# Altium PCB adau1979-fpga.PcbDoc (part 4 of 10)
Units mil, origin at the board's own origin, x right, y up, seen from the top; angles counter-clockwise.
Board outline 7874.02 x 9055.12 mil, 4 copper layers (Top Layer, GND, POWER, Bottom Layer), stack 23.756 mil thick; 636 components, 457 nets, 2015 pads, 4184 vias.
Unrouted connection lines stored in the file: 10.
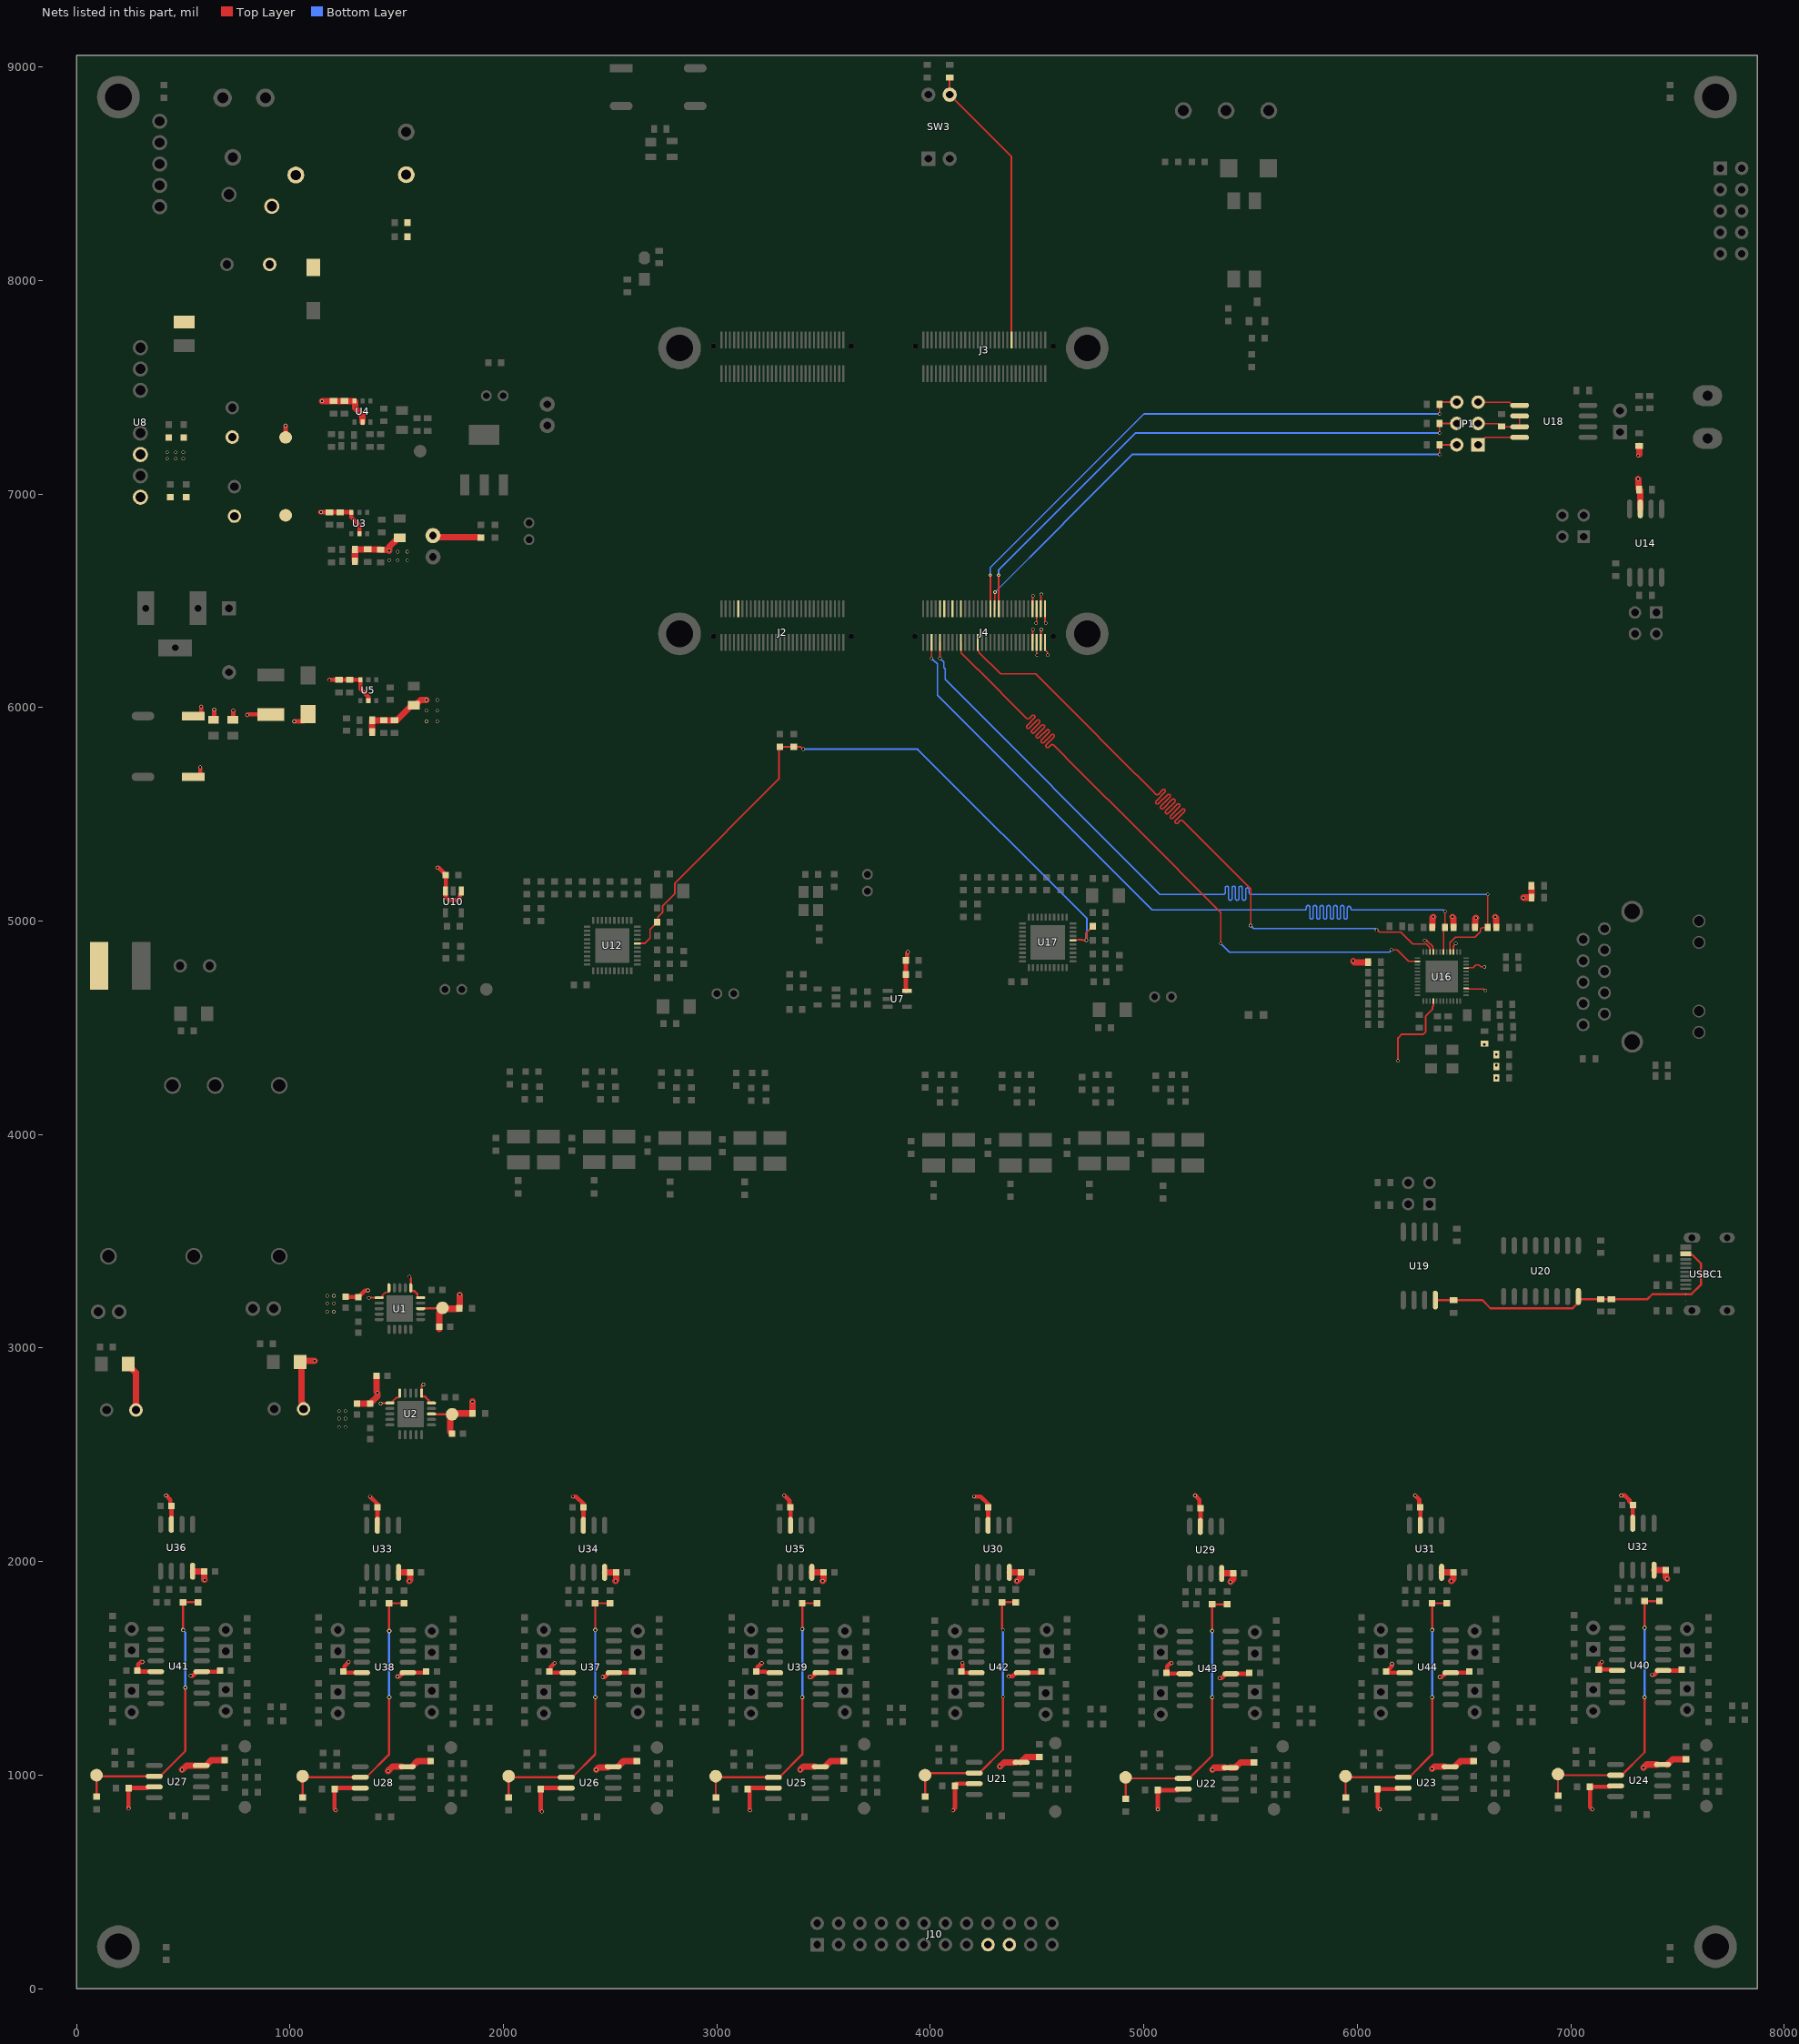
[diagram p4: the nets of this part, all layers, seen from the top]

## Part data (continued)
R1 R2 R3 R4 R5 R6 R7 R8 R9 R10 R11 R12 R13 R14 R15 R16 R17 R18 R19 R20 R21 R22 R23 R24 R27 R28 R29 R31 R32 R33 R34 R35 R (continued)
  R190: AddInBom=yes, DesignItemID=R, Device=R, FootprintName="R 0603_L", LibraryName="0.1 - 电阻-电容-电感", Origin Footprint="R 0201_L", OriginFootprint 2="R 0402_L", OriginFootprint 3="R 0805_L", OriginFootprint 4="R 1206_L", OriginFootprint 5="R 1210_L", OriginFootprint 6="R 1812_L", OriginFootprint 7="R 2010_L", OriginFootprint 8="R 2512_L", OriginFootprint 9="R 0201_M", OriginFootprint 10="R 0402_M", OriginFootprint 11="R 0603_M", OriginFootprint 12="R 0805_M", OriginFootprint 13="R 1206_M", OriginFootprint 14="R 1210_M", OriginFootprint 15="R 1812_M", OriginFootprint 16="R 2010_M", OriginFootprint 17="R 2512_M", OriginModelName="R 0603", SymbolName=R, UniqueId=bc27cb7a11a997be, 封装库来自淘宝卖家 ID：黄晶宝石=其他店铺购入均为盗版，不享受售后技术支持服务，请立即申请退款, 版权归属="来自淘宝 ID：黄晶宝石", 联系售后=https://shop463601444.taobao.com
  R191: AddInBom=yes, DesignItemID=R, Device=R, FootprintName="R 0603_L", LibraryName="0.1 - 电阻-电容-电感", Origin Footprint="R 0201_L", OriginFootprint 2="R 0402_L", OriginFootprint 3="R 0805_L", OriginFootprint 4="R 1206_L", OriginFootprint 5="R 1210_L", OriginFootprint 6="R 1812_L", OriginFootprint 7="R 2010_L", OriginFootprint 8="R 2512_L", OriginFootprint 9="R 0201_M", OriginFootprint 10="R 0402_M", OriginFootprint 11="R 0603_M", OriginFootprint 12="R 0805_M", OriginFootprint 13="R 1206_M", OriginFootprint 14="R 1210_M", OriginFootprint 15="R 1812_M", OriginFootprint 16="R 2010_M", OriginFootprint 17="R 2512_M", OriginModelName="R 0603", SymbolName=R, UniqueId=a6f8c12e5677218f, 封装库来自淘宝卖家 ID：黄晶宝石=其他店铺购入均为盗版，不享受售后技术支持服务，请立即申请退款, 版权归属="来自淘宝 ID：黄晶宝石", 联系售后=https://shop463601444.taobao.com
  R192: AddInBom=yes, DesignItemID=R, Device=R, FootprintName="R 0603_L", LibraryName="0.1 - 电阻-电容-电感", Origin Footprint="R 0201_L", OriginFootprint 2="R 0402_L", OriginFootprint 3="R 0805_L", OriginFootprint 4="R 1206_L", OriginFootprint 5="R 1210_L", OriginFootprint 6="R 1812_L", OriginFootprint 7="R 2010_L", OriginFootprint 8="R 2512_L", OriginFootprint 9="R 0201_M", OriginFootprint 10="R 0402_M", OriginFootprint 11="R 0603_M", OriginFootprint 12="R 0805_M", OriginFootprint 13="R 1206_M", OriginFootprint 14="R 1210_M", OriginFootprint 15="R 1812_M", OriginFootprint 16="R 2010_M", OriginFootprint 17="R 2512_M", OriginModelName="R 0603", SymbolName=R, UniqueId=da75effbc0c418b2, 封装库来自淘宝卖家 ID：黄晶宝石=其他店铺购入均为盗版，不享受售后技术支持服务，请立即申请退款, 版权归属="来自淘宝 ID：黄晶宝石", 联系售后=https://shop463601444.taobao.com
  R194: AddInBom=yes, DesignItemID=R, Device=R, FootprintName="R 0603_L", LibraryName="0.1 - 电阻-电容-电感", Origin Footprint="R 0201_L", OriginFootprint 2="R 0402_L", OriginFootprint 3="R 0805_L", OriginFootprint 4="R 1206_L", OriginFootprint 5="R 1210_L", OriginFootprint 6="R 1812_L", OriginFootprint 7="R 2010_L", OriginFootprint 8="R 2512_L", OriginFootprint 9="R 0201_M", OriginFootprint 10="R 0402_M", OriginFootprint 11="R 0603_M", OriginFootprint 12="R 0805_M", OriginFootprint 13="R 1206_M", OriginFootprint 14="R 1210_M", OriginFootprint 15="R 1812_M", OriginFootprint 16="R 2010_M", OriginFootprint 17="R 2512_M", OriginModelName="R 0603", SymbolName=R, UniqueId=41260ea8bae6dc8d, 封装库来自淘宝卖家 ID：黄晶宝石=其他店铺购入均为盗版，不享受售后技术支持服务，请立即申请退款, 版权归属="来自淘宝 ID：黄晶宝石", 联系售后=https://shop463601444.taobao.com
  R195: AddInBom=yes, DesignItemID=R, Device=R, FootprintName="R 0603_L", LibraryName="0.1 - 电阻-电容-电感", Origin Footprint="R 0201_L", OriginFootprint 2="R 0402_L", OriginFootprint 3="R 0805_L", OriginFootprint 4="R 1206_L", OriginFootprint 5="R 1210_L", OriginFootprint 6="R 1812_L", OriginFootprint 7="R 2010_L", OriginFootprint 8="R 2512_L", OriginFootprint 9="R 0201_M", OriginFootprint 10="R 0402_M", OriginFootprint 11="R 0603_M", OriginFootprint 12="R 0805_M", OriginFootprint 13="R 1206_M", OriginFootprint 14="R 1210_M", OriginFootprint 15="R 1812_M", OriginFootprint 16="R 2010_M", OriginFootprint 17="R 2512_M", OriginModelName="R 0603", SymbolName=R, UniqueId=df29ef2d077fcbbf, 封装库来自淘宝卖家 ID：黄晶宝石=其他店铺购入均为盗版，不享受售后技术支持服务，请立即申请退款, 版权归属="来自淘宝 ID：黄晶宝石", 联系售后=https://shop463601444.taobao.com
  R196: AddInBom=yes, DesignItemID=R, Device=R, FootprintName="R 0603_L", LibraryName="0.1 - 电阻-电容-电感", Origin Footprint="R 0201_L", OriginFootprint 2="R 0402_L", OriginFootprint 3="R 0805_L", OriginFootprint 4="R 1206_L", OriginFootprint 5="R 1210_L", OriginFootprint 6="R 1812_L", OriginFootprint 7="R 2010_L", OriginFootprint 8="R 2512_L", OriginFootprint 9="R 0201_M", OriginFootprint 10="R 0402_M", OriginFootprint 11="R 0603_M", OriginFootprint 12="R 0805_M", OriginFootprint 13="R 1206_M", OriginFootprint 14="R 1210_M", OriginFootprint 15="R 1812_M", OriginFootprint 16="R 2010_M", OriginFootprint 17="R 2512_M", OriginModelName="R 0603", SymbolName=R, UniqueId=e988a913e3416cdd, 封装库来自淘宝卖家 ID：黄晶宝石=其他店铺购入均为盗版，不享受售后技术支持服务，请立即申请退款, 版权归属="来自淘宝 ID：黄晶宝石", 联系售后=https://shop463601444.taobao.com
  R197: AddInBom=yes, DesignItemID=R, Device=R, FootprintName="R 0603_L", LibraryName="0.1 - 电阻-电容-电感", Origin Footprint="R 0201_L", OriginFootprint 2="R 0402_L", OriginFootprint 3="R 0805_L", OriginFootprint 4="R 1206_L", OriginFootprint 5="R 1210_L", OriginFootprint 6="R 1812_L", OriginFootprint 7="R 2010_L", OriginFootprint 8="R 2512_L", OriginFootprint 9="R 0201_M", OriginFootprint 10="R 0402_M", OriginFootprint 11="R 0603_M", OriginFootprint 12="R 0805_M", OriginFootprint 13="R 1206_M", OriginFootprint 14="R 1210_M", OriginFootprint 15="R 1812_M", OriginFootprint 16="R 2010_M", OriginFootprint 17="R 2512_M", OriginModelName="R 0603", SymbolName=R, UniqueId=a1dc1d7ffb4193e6, 封装库来自淘宝卖家 ID：黄晶宝石=其他店铺购入均为盗版，不享受售后技术支持服务，请立即申请退款, 版权归属="来自淘宝 ID：黄晶宝石", 联系售后=https://shop463601444.taobao.com
  R198: AddInBom=yes, DesignItemID=R, Device=R, FootprintName="R 0603_L", LibraryName="0.1 - 电阻-电容-电感", Origin Footprint="R 0201_L", OriginFootprint 2="R 0402_L", OriginFootprint 3="R 0805_L", OriginFootprint 4="R 1206_L", OriginFootprint 5="R 1210_L", OriginFootprint 6="R 1812_L", OriginFootprint 7="R 2010_L", OriginFootprint 8="R 2512_L", OriginFootprint 9="R 0201_M", OriginFootprint 10="R 0402_M", OriginFootprint 11="R 0603_M", OriginFootprint 12="R 0805_M", OriginFootprint 13="R 1206_M", OriginFootprint 14="R 1210_M", OriginFootprint 15="R 1812_M", OriginFootprint 16="R 2010_M", OriginFootprint 17="R 2512_M", OriginModelName="R 0603", SymbolName=R, UniqueId=94189e0415d5623f, 封装库来自淘宝卖家 ID：黄晶宝石=其他店铺购入均为盗版，不享受售后技术支持服务，请立即申请退款, 版权归属="来自淘宝 ID：黄晶宝石", 联系售后=https://shop463601444.taobao.com
  R199: AddInBom=yes, DesignItemID=R, Device=R, FootprintName="R 0603_L", LibraryName="0.1 - 电阻-电容-电感", Origin Footprint="R 0201_L", OriginFootprint 2="R 0402_L", OriginFootprint 3="R 0805_L", OriginFootprint 4="R 1206_L", OriginFootprint 5="R 1210_L", OriginFootprint 6="R 1812_L", OriginFootprint 7="R 2010_L", OriginFootprint 8="R 2512_L", OriginFootprint 9="R 0201_M", OriginFootprint 10="R 0402_M", OriginFootprint 11="R 0603_M", OriginFootprint 12="R 0805_M", OriginFootprint 13="R 1206_M", OriginFootprint 14="R 1210_M", OriginFootprint 15="R 1812_M", OriginFootprint 16="R 2010_M", OriginFootprint 17="R 2512_M", OriginModelName="R 0603", SymbolName=R, UniqueId=acf15e2cdf1c818f, 封装库来自淘宝卖家 ID：黄晶宝石=其他店铺购入均为盗版，不享受售后技术支持服务，请立即申请退款, 版权归属="来自淘宝 ID：黄晶宝石", 联系售后=https://shop463601444.taobao.com
  R200: AddInBom=yes, DesignItemID=R, Device=R, FootprintName="R 0603_L", LibraryName="0.1 - 电阻-电容-电感", Origin Footprint="R 0201_L", OriginFootprint 2="R 0402_L", OriginFootprint 3="R 0805_L", OriginFootprint 4="R 1206_L", OriginFootprint 5="R 1210_L", OriginFootprint 6="R 1812_L", OriginFootprint 7="R 2010_L", OriginFootprint 8="R 2512_L", OriginFootprint 9="R 0201_M", OriginFootprint 10="R 0402_M", OriginFootprint 11="R 0603_M", OriginFootprint 12="R 0805_M", OriginFootprint 13="R 1206_M", OriginFootprint 14="R 1210_M", OriginFootprint 15="R 1812_M", OriginFootprint 16="R 2010_M", OriginFootprint 17="R 2512_M", OriginModelName="R 0603", SymbolName=R, UniqueId=3520350cb8a16ddf, 封装库来自淘宝卖家 ID：黄晶宝石=其他店铺购入均为盗版，不享受售后技术支持服务，请立即申请退款, 版权归属="来自淘宝 ID：黄晶宝石", 联系售后=https://shop463601444.taobao.com
  R201: AddInBom=yes, DesignItemID=R, Device=R, FootprintName="R 0603_L", LibraryName="0.1 - 电阻-电容-电感", Origin Footprint="R 0201_L", OriginFootprint 2="R 0402_L", OriginFootprint 3="R 0805_L", OriginFootprint 4="R 1206_L", OriginFootprint 5="R 1210_L", OriginFootprint 6="R 1812_L", OriginFootprint 7="R 2010_L", OriginFootprint 8="R 2512_L", OriginFootprint 9="R 0201_M", OriginFootprint 10="R 0402_M", OriginFootprint 11="R 0603_M", OriginFootprint 12="R 0805_M", OriginFootprint 13="R 1206_M", OriginFootprint 14="R 1210_M", OriginFootprint 15="R 1812_M", OriginFootprint 16="R 2010_M", OriginFootprint 17="R 2512_M", OriginModelName="R 0603", SymbolName=R, UniqueId=ff64ea784eb901ab, 封装库来自淘宝卖家 ID：黄晶宝石=其他店铺购入均为盗版，不享受售后技术支持服务，请立即申请退款, 版权归属="来自淘宝 ID：黄晶宝石", 联系售后=https://shop463601444.taobao.com
  R202: AddInBom=yes, DesignItemID=R, Device=R, FootprintName="R 0603_L", LibraryName="0.1 - 电阻-电容-电感", Origin Footprint="R 0201_L", OriginFootprint 2="R 0402_L", OriginFootprint 3="R 0805_L", OriginFootprint 4="R 1206_L", OriginFootprint 5="R 1210_L", OriginFootprint 6="R 1812_L", OriginFootprint 7="R 2010_L", OriginFootprint 8="R 2512_L", OriginFootprint 9="R 0201_M", OriginFootprint 10="R 0402_M", OriginFootprint 11="R 0603_M", OriginFootprint 12="R 0805_M", OriginFootprint 13="R 1206_M", OriginFootprint 14="R 1210_M", OriginFootprint 15="R 1812_M", OriginFootprint 16="R 2010_M", OriginFootprint 17="R 2512_M", OriginModelName="R 0603", SymbolName=R, UniqueId=1887dacec97403d3, 封装库来自淘宝卖家 ID：黄晶宝石=其他店铺购入均为盗版，不享受售后技术支持服务，请立即申请退款, 版权归属="来自淘宝 ID：黄晶宝石", 联系售后=https://shop463601444.taobao.com
  R203: AddInBom=yes, DesignItemID=R, Device=R, FootprintName="R 0603_L", LibraryName="0.1 - 电阻-电容-电感", Origin Footprint="R 0201_L", OriginFootprint 2="R 0402_L", OriginFootprint 3="R 0805_L", OriginFootprint 4="R 1206_L", OriginFootprint 5="R 1210_L", OriginFootprint 6="R 1812_L", OriginFootprint 7="R 2010_L", OriginFootprint 8="R 2512_L", OriginFootprint 9="R 0201_M", OriginFootprint 10="R 0402_M", OriginFootprint 11="R 0603_M", OriginFootprint 12="R 0805_M", OriginFootprint 13="R 1206_M", OriginFootprint 14="R 1210_M", OriginFootprint 15="R 1812_M", OriginFootprint 16="R 2010_M", OriginFootprint 17="R 2512_M", OriginModelName="R 0603", SymbolName=R, UniqueId=90aa3c19b060f889, 封装库来自淘宝卖家 ID：黄晶宝石=其他店铺购入均为盗版，不享受售后技术支持服务，请立即申请退款, 版权归属="来自淘宝 ID：黄晶宝石", 联系售后=https://shop463601444.taobao.com
  R206: AddInBom=yes, DesignItemID=R, Device=R, FootprintName="R 0603_L", LibraryName="0.1 - 电阻-电容-电感", Origin Footprint="R 0201_L", OriginFootprint 2="R 0402_L", OriginFootprint 3="R 0805_L", OriginFootprint 4="R 1206_L", OriginFootprint 5="R 1210_L", OriginFootprint 6="R 1812_L", OriginFootprint 7="R 2010_L", OriginFootprint 8="R 2512_L", OriginFootprint 9="R 0201_M", OriginFootprint 10="R 0402_M", OriginFootprint 11="R 0603_M", OriginFootprint 12="R 0805_M", OriginFootprint 13="R 1206_M", OriginFootprint 14="R 1210_M", OriginFootprint 15="R 1812_M", OriginFootprint 16="R 2010_M", OriginFootprint 17="R 2512_M", OriginModelName="R 0603", SymbolName=R, UniqueId=50053c9146ba4240, 封装库来自淘宝卖家 ID：黄晶宝石=其他店铺购入均为盗版，不享受售后技术支持服务，请立即申请退款, 版权归属="来自淘宝 ID：黄晶宝石", 联系售后=https://shop463601444.taobao.com
  R207: AddInBom=yes, DesignItemID=R, Device=R, FootprintName="R 0603_L", LibraryName="0.1 - 电阻-电容-电感", Origin Footprint="R 0201_L", OriginFootprint 2="R 0402_L", OriginFootprint 3="R 0805_L", OriginFootprint 4="R 1206_L", OriginFootprint 5="R 1210_L", OriginFootprint 6="R 1812_L", OriginFootprint 7="R 2010_L", OriginFootprint 8="R 2512_L", OriginFootprint 9="R 0201_M", OriginFootprint 10="R 0402_M", OriginFootprint 11="R 0603_M", OriginFootprint 12="R 0805_M", OriginFootprint 13="R 1206_M", OriginFootprint 14="R 1210_M", OriginFootprint 15="R 1812_M", OriginFootprint 16="R 2010_M", OriginFootprint 17="R 2512_M", OriginModelName="R 0603", SymbolName=R, UniqueId=55d3b7675eee0b5f, 封装库来自淘宝卖家 ID：黄晶宝石=其他店铺购入均为盗版，不享受售后技术支持服务，请立即申请退款, 版权归属="来自淘宝 ID：黄晶宝石", 联系售后=https://shop463601444.taobao.com
  R209: AddInBom=yes, DesignItemID=R, Device=R, FootprintName="R 0603_L", LibraryName="0.1 - 电阻-电容-电感", Origin Footprint="R 0201_L", OriginFootprint 2="R 0402_L", OriginFootprint 3="R 0805_L", OriginFootprint 4="R 1206_L", OriginFootprint 5="R 1210_L", OriginFootprint 6="R 1812_L", OriginFootprint 7="R 2010_L", OriginFootprint 8="R 2512_L", OriginFootprint 9="R 0201_M", OriginFootprint 10="R 0402_M", OriginFootprint 11="R 0603_M", OriginFootprint 12="R 0805_M", OriginFootprint 13="R 1206_M", OriginFootprint 14="R 1210_M", OriginFootprint 15="R 1812_M", OriginFootprint 16="R 2010_M", OriginFootprint 17="R 2512_M", OriginModelName="R 0603", SymbolName=R, UniqueId=28145adf450505d9, 封装库来自淘宝卖家 ID：黄晶宝石=其他店铺购入均为盗版，不享受售后技术支持服务，请立即申请退款, 版权归属="来自淘宝 ID：黄晶宝石", 联系售后=https://shop463601444.taobao.com
  R210: AddInBom=yes, DesignItemID=R, Device=R, FootprintName="R 0603_L", LibraryName="0.1 - 电阻-电容-电感", Origin Footprint="R 0201_L", OriginFootprint 2="R 0402_L", OriginFootprint 3="R 0805_L", OriginFootprint 4="R 1206_L", OriginFootprint 5="R 1210_L", OriginFootprint 6="R 1812_L", OriginFootprint 7="R 2010_L", OriginFootprint 8="R 2512_L", OriginFootprint 9="R 0201_M", OriginFootprint 10="R 0402_M", OriginFootprint 11="R 0603_M", OriginFootprint 12="R 0805_M", OriginFootprint 13="R 1206_M", OriginFootprint 14="R 1210_M", OriginFootprint 15="R 1812_M", OriginFootprint 16="R 2010_M", OriginFootprint 17="R 2512_M", OriginModelName="R 0603", SymbolName=R, UniqueId=6a81be30a454b297, 封装库来自淘宝卖家 ID：黄晶宝石=其他店铺购入均为盗版，不享受售后技术支持服务，请立即申请退款, 版权归属="来自淘宝 ID：黄晶宝石", 联系售后=https://shop463601444.taobao.com
  R214: AddInBom=yes, DesignItemID=R, Device=R, FootprintName="R 0603_L", LibraryName="0.1 - 电阻-电容-电感", Origin Footprint="R 0201_L", OriginFootprint 2="R 0402_L", OriginFootprint 3="R 0805_L", OriginFootprint 4="R 1206_L", OriginFootprint 5="R 1210_L", OriginFootprint 6="R 1812_L", OriginFootprint 7="R 2010_L", OriginFootprint 8="R 2512_L", OriginFootprint 9="R 0201_M", OriginFootprint 10="R 0402_M", OriginFootprint 11="R 0603_M", OriginFootprint 12="R 0805_M", OriginFootprint 13="R 1206_M", OriginFootprint 14="R 1210_M", OriginFootprint 15="R 1812_M", OriginFootprint 16="R 2010_M", OriginFootprint 17="R 2512_M", OriginModelName="R 0603", SymbolName=R, UniqueId=356270ea20700a9c, 封装库来自淘宝卖家 ID：黄晶宝石=其他店铺购入均为盗版，不享受售后技术支持服务，请立即申请退款, 版权归属="来自淘宝 ID：黄晶宝石", 联系售后=https://shop463601444.taobao.com
  R215: AddInBom=yes, DesignItemID=R, Device=R, FootprintName="R 0603_L", LibraryName="0.1 - 电阻-电容-电感", Origin Footprint="R 0201_L", OriginFootprint 2="R 0402_L", OriginFootprint 3="R 0805_L", OriginFootprint 4="R 1206_L", OriginFootprint 5="R 1210_L", OriginFootprint 6="R 1812_L", OriginFootprint 7="R 2010_L", OriginFootprint 8="R 2512_L", OriginFootprint 9="R 0201_M", OriginFootprint 10="R 0402_M", OriginFootprint 11="R 0603_M", OriginFootprint 12="R 0805_M", OriginFootprint 13="R 1206_M", OriginFootprint 14="R 1210_M", OriginFootprint 15="R 1812_M", OriginFootprint 16="R 2010_M", OriginFootprint 17="R 2512_M", OriginModelName="R 0603", SymbolName=R, UniqueId=0bc07fc535f36e79, 封装库来自淘宝卖家 ID：黄晶宝石=其他店铺购入均为盗版，不享受售后技术支持服务，请立即申请退款, 版权归属="来自淘宝 ID：黄晶宝石", 联系售后=https://shop463601444.taobao.com
  R216: AddInBom=yes, DesignItemID=R, Device=R, FootprintName="R 0603_L", LibraryName="0.1 - 电阻-电容-电感", Origin Footprint="R 0201_L", OriginFootprint 2="R 0402_L", OriginFootprint 3="R 0805_L", OriginFootprint 4="R 1206_L", OriginFootprint 5="R 1210_L", OriginFootprint 6="R 1812_L", OriginFootprint 7="R 2010_L", OriginFootprint 8="R 2512_L", OriginFootprint 9="R 0201_M", OriginFootprint 10="R 0402_M", OriginFootprint 11="R 0603_M", OriginFootprint 12="R 0805_M", OriginFootprint 13="R 1206_M", OriginFootprint 14="R 1210_M", OriginFootprint 15="R 1812_M", OriginFootprint 16="R 2010_M", OriginFootprint 17="R 2512_M", OriginModelName="R 0603", SymbolName=R, UniqueId=4df6a426e202bc68, 封装库来自淘宝卖家 ID：黄晶宝石=其他店铺购入均为盗版，不享受售后技术支持服务，请立即申请退款, 版权归属="来自淘宝 ID：黄晶宝石", 联系售后=https://shop463601444.taobao.com
  R217: AddInBom=yes, DesignItemID=R, Device=R, FootprintName="R 0603_L", LibraryName="0.1 - 电阻-电容-电感", Origin Footprint="R 0201_L", OriginFootprint 2="R 0402_L", OriginFootprint 3="R 0805_L", OriginFootprint 4="R 1206_L", OriginFootprint 5="R 1210_L", OriginFootprint 6="R 1812_L", OriginFootprint 7="R 2010_L", OriginFootprint 8="R 2512_L", OriginFootprint 9="R 0201_M", OriginFootprint 10="R 0402_M", OriginFootprint 11="R 0603_M", OriginFootprint 12="R 0805_M", OriginFootprint 13="R 1206_M", OriginFootprint 14="R 1210_M", OriginFootprint 15="R 1812_M", OriginFootprint 16="R 2010_M", OriginFootprint 17="R 2512_M", OriginModelName="R 0603", SymbolName=R, UniqueId=b62d5738e8aadfe3, 封装库来自淘宝卖家 ID：黄晶宝石=其他店铺购入均为盗版，不享受售后技术支持服务，请立即申请退款, 版权归属="来自淘宝 ID：黄晶宝石", 联系售后=https://shop463601444.taobao.com
  R219: AddInBom=yes, DesignItemID=R, Device=R, FootprintName="R 0603_L", LibraryName="0.1 - 电阻-电容-电感", Origin Footprint="R 0201_L", OriginFootprint 2="R 0402_L", OriginFootprint 3="R 0805_L", OriginFootprint 4="R 1206_L", OriginFootprint 5="R 1210_L", OriginFootprint 6="R 1812_L", OriginFootprint 7="R 2010_L", OriginFootprint 8="R 2512_L", OriginFootprint 9="R 0201_M", OriginFootprint 10="R 0402_M", OriginFootprint 11="R 0603_M", OriginFootprint 12="R 0805_M", OriginFootprint 13="R 1206_M", OriginFootprint 14="R 1210_M", OriginFootprint 15="R 1812_M", OriginFootprint 16="R 2010_M", OriginFootprint 17="R 2512_M", OriginModelName="R 0603", SymbolName=R, UniqueId=f6a722bea999a1f8, 封装库来自淘宝卖家 ID：黄晶宝石=其他店铺购入均为盗版，不享受售后技术支持服务，请立即申请退款, 版权归属="来自淘宝 ID：黄晶宝石", 联系售后=https://shop463601444.taobao.com
  R220: AddInBom=yes, DesignItemID=R, Device=R, FootprintName="R 0603_L", LibraryName="0.1 - 电阻-电容-电感", Origin Footprint="R 0201_L", OriginFootprint 2="R 0402_L", OriginFootprint 3="R 0805_L", OriginFootprint 4="R 1206_L", OriginFootprint 5="R 1210_L", OriginFootprint 6="R 1812_L", OriginFootprint 7="R 2010_L", OriginFootprint 8="R 2512_L", OriginFootprint 9="R 0201_M", OriginFootprint 10="R 0402_M", OriginFootprint 11="R 0603_M", OriginFootprint 12="R 0805_M", OriginFootprint 13="R 1206_M", OriginFootprint 14="R 1210_M", OriginFootprint 15="R 1812_M", OriginFootprint 16="R 2010_M", OriginFootprint 17="R 2512_M", OriginModelName="R 0603", SymbolName=R, UniqueId=85b67f9d76b2e874, 封装库来自淘宝卖家 ID：黄晶宝石=其他店铺购入均为盗版，不享受售后技术支持服务，请立即申请退款, 版权归属="来自淘宝 ID：黄晶宝石", 联系售后=https://shop463601444.taobao.com
  R222: AddInBom=yes, DesignItemID=R, Device=R, FootprintName="R 0603_L", LibraryName="0.1 - 电阻-电容-电感", Origin Footprint="R 0201_L", OriginFootprint 2="R 0402_L", OriginFootprint 3="R 0805_L", OriginFootprint 4="R 1206_L", OriginFootprint 5="R 1210_L", OriginFootprint 6="R 1812_L", OriginFootprint 7="R 2010_L", OriginFootprint 8="R 2512_L", OriginFootprint 9="R 0201_M", OriginFootprint 10="R 0402_M", OriginFootprint 11="R 0603_M", OriginFootprint 12="R 0805_M", OriginFootprint 13="R 1206_M", OriginFootprint 14="R 1210_M", OriginFootprint 15="R 1812_M", OriginFootprint 16="R 2010_M", OriginFootprint 17="R 2512_M", OriginModelName="R 0603", SymbolName=R, UniqueId=e0ee0f05e2f0b4da, 封装库来自淘宝卖家 ID：黄晶宝石=其他店铺购入均为盗版，不享受售后技术支持服务，请立即申请退款, 版权归属="来自淘宝 ID：黄晶宝石", 联系售后=https://shop463601444.taobao.com
  R223: AddInBom=yes, DesignItemID=R, Device=R, FootprintName="R 0603_L", LibraryName="0.1 - 电阻-电容-电感", Origin Footprint="R 0201_L", OriginFootprint 2="R 0402_L", OriginFootprint 3="R 0805_L", OriginFootprint 4="R 1206_L", OriginFootprint 5="R 1210_L", OriginFootprint 6="R 1812_L", OriginFootprint 7="R 2010_L", OriginFootprint 8="R 2512_L", OriginFootprint 9="R 0201_M", OriginFootprint 10="R 0402_M", OriginFootprint 11="R 0603_M", OriginFootprint 12="R 0805_M", OriginFootprint 13="R 1206_M", OriginFootprint 14="R 1210_M", OriginFootprint 15="R 1812_M", OriginFootprint 16="R 2010_M", OriginFootprint 17="R 2512_M", OriginModelName="R 0603", SymbolName=R, UniqueId=3fbbebc0b09736fe, 封装库来自淘宝卖家 ID：黄晶宝石=其他店铺购入均为盗版，不享受售后技术支持服务，请立即申请退款, 版权归属="来自淘宝 ID：黄晶宝石", 联系售后=https://shop463601444.taobao.com
  R224: AddInBom=yes, DesignItemID=R, Device=R, FootprintName="R 0603_L", LibraryName="0.1 - 电阻-电容-电感", Origin Footprint="R 0201_L", OriginFootprint 2="R 0402_L", OriginFootprint 3="R 0805_L", OriginFootprint 4="R 1206_L", OriginFootprint 5="R 1210_L", OriginFootprint 6="R 1812_L", OriginFootprint 7="R 2010_L", OriginFootprint 8="R 2512_L", OriginFootprint 9="R 0201_M", OriginFootprint 10="R 0402_M", OriginFootprint 11="R 0603_M", OriginFootprint 12="R 0805_M", OriginFootprint 13="R 1206_M", OriginFootprint 14="R 1210_M", OriginFootprint 15="R 1812_M", OriginFootprint 16="R 2010_M", OriginFootprint 17="R 2512_M", OriginModelName="R 0603", SymbolName=R, UniqueId=1ad54b734ffff27e, 封装库来自淘宝卖家 ID：黄晶宝石=其他店铺购入均为盗版，不享受售后技术支持服务，请立即申请退款, 版权归属="来自淘宝 ID：黄晶宝石", 联系售后=https://shop463601444.taobao.com
  R225: AddInBom=yes, DesignItemID=R, Device=R, FootprintName="R 0603_L", LibraryName="0.1 - 电阻-电容-电感", Origin Footprint="R 0201_L", OriginFootprint 2="R 0402_L", OriginFootprint 3="R 0805_L", OriginFootprint 4="R 1206_L", OriginFootprint 5="R 1210_L", OriginFootprint 6="R 1812_L", OriginFootprint 7="R 2010_L", OriginFootprint 8="R 2512_L", OriginFootprint 9="R 0201_M", OriginFootprint 10="R 0402_M", OriginFootprint 11="R 0603_M", OriginFootprint 12="R 0805_M", OriginFootprint 13="R 1206_M", OriginFootprint 14="R 1210_M", OriginFootprint 15="R 1812_M", OriginFootprint 16="R 2010_M", OriginFootprint 17="R 2512_M", OriginModelName="R 0603", SymbolName=R, UniqueId=1733e0132aa39ad1, 封装库来自淘宝卖家 ID：黄晶宝石=其他店铺购入均为盗版，不享受售后技术支持服务，请立即申请退款, 版权归属="来自淘宝 ID：黄晶宝石", 联系售后=https://shop463601444.taobao.com
  R226: AddInBom=yes, DesignItemID=R, Device=R, FootprintName="R 0603_L", LibraryName="0.1 - 电阻-电容-电感", Origin Footprint="R 0201_L", OriginFootprint 2="R 0402_L", OriginFootprint 3="R 0805_L", OriginFootprint 4="R 1206_L", OriginFootprint 5="R 1210_L", OriginFootprint 6="R 1812_L", OriginFootprint 7="R 2010_L", OriginFootprint 8="R 2512_L", OriginFootprint 9="R 0201_M", OriginFootprint 10="R 0402_M", OriginFootprint 11="R 0603_M", OriginFootprint 12="R 0805_M", OriginFootprint 13="R 1206_M", OriginFootprint 14="R 1210_M", OriginFootprint 15="R 1812_M", OriginFootprint 16="R 2010_M", OriginFootprint 17="R 2512_M", OriginModelName="R 0603", SymbolName=R, UniqueId=e174b74f1d9ac547, 封装库来自淘宝卖家 ID：黄晶宝石=其他店铺购入均为盗版，不享受售后技术支持服务，请立即申请退款, 版权归属="来自淘宝 ID：黄晶宝石", 联系售后=https://shop463601444.taobao.com
  R227: AddInBom=yes, DesignItemID=R, Device=R, FootprintName="R 0603_L", LibraryName="0.1 - 电阻-电容-电感", Origin Footprint="R 0201_L", OriginFootprint 2="R 0402_L", OriginFootprint 3="R 0805_L", OriginFootprint 4="R 1206_L", OriginFootprint 5="R 1210_L", OriginFootprint 6="R 1812_L", OriginFootprint 7="R 2010_L", OriginFootprint 8="R 2512_L", OriginFootprint 9="R 0201_M", OriginFootprint 10="R 0402_M", OriginFootprint 11="R 0603_M", OriginFootprint 12="R 0805_M", OriginFootprint 13="R 1206_M", OriginFootprint 14="R 1210_M", OriginFootprint 15="R 1812_M", OriginFootprint 16="R 2010_M", OriginFootprint 17="R 2512_M", OriginModelName="R 0603", SymbolName=R, UniqueId=c6a558d5d37ead57, 封装库来自淘宝卖家 ID：黄晶宝石=其他店铺购入均为盗版，不享受售后技术支持服务，请立即申请退款, 版权归属="来自淘宝 ID：黄晶宝石", 联系售后=https://shop463601444.taobao.com
  R229: AddInBom=yes, DesignItemID=R, Device=R, FootprintName="R 0603_L", LibraryName="0.1 - 电阻-电容-电感", Origin Footprint="R 0201_L", OriginFootprint 2="R 0402_L", OriginFootprint 3="R 0805_L", OriginFootprint 4="R 1206_L", OriginFootprint 5="R 1210_L", OriginFootprint 6="R 1812_L", OriginFootprint 7="R 2010_L", OriginFootprint 8="R 2512_L", OriginFootprint 9="R 0201_M", OriginFootprint 10="R 0402_M", OriginFootprint 11="R 0603_M", OriginFootprint 12="R 0805_M", OriginFootprint 13="R 1206_M", OriginFootprint 14="R 1210_M", OriginFootprint 15="R 1812_M", OriginFootprint 16="R 2010_M", OriginFootprint 17="R 2512_M", OriginModelName="R 0603", SymbolName=R, UniqueId=5dfbcaad1eafe703, 封装库来自淘宝卖家 ID：黄晶宝石=其他店铺购入均为盗版，不享受售后技术支持服务，请立即申请退款, 版权归属="来自淘宝 ID：黄晶宝石", 联系售后=https://shop463601444.taobao.com
  R231: AddInBom=yes, DesignItemID=R, Device=R, FootprintName="R 0603_L", LibraryName="0.1 - 电阻-电容-电感", Origin Footprint="R 0201_L", OriginFootprint 2="R 0402_L", OriginFootprint 3="R 0805_L", OriginFootprint 4="R 1206_L", OriginFootprint 5="R 1210_L", OriginFootprint 6="R 1812_L", OriginFootprint 7="R 2010_L", OriginFootprint 8="R 2512_L", OriginFootprint 9="R 0201_M", OriginFootprint 10="R 0402_M", OriginFootprint 11="R 0603_M", OriginFootprint 12="R 0805_M", OriginFootprint 13="R 1206_M", OriginFootprint 14="R 1210_M", OriginFootprint 15="R 1812_M", OriginFootprint 16="R 2010_M", OriginFootprint 17="R 2512_M", OriginModelName="R 0603", SymbolName=R, UniqueId=bf789344b0fac116, 封装库来自淘宝卖家 ID：黄晶宝石=其他店铺购入均为盗版，不享受售后技术支持服务，请立即申请退款, 版权归属="来自淘宝 ID：黄晶宝石", 联系售后=https://shop463601444.taobao.com
  R233: AddInBom=yes, DesignItemID=R, Device=R, FootprintName="R 0603_L", LibraryName="0.1 - 电阻-电容-电感", Origin Footprint="R 0201_L", OriginFootprint 2="R 0402_L", OriginFootprint 3="R 0805_L", OriginFootprint 4="R 1206_L", OriginFootprint 5="R 1210_L", OriginFootprint 6="R 1812_L", OriginFootprint 7="R 2010_L", OriginFootprint 8="R 2512_L", OriginFootprint 9="R 0201_M", OriginFootprint 10="R 0402_M", OriginFootprint 11="R 0603_M", OriginFootprint 12="R 0805_M", OriginFootprint 13="R 1206_M", OriginFootprint 14="R 1210_M", OriginFootprint 15="R 1812_M", OriginFootprint 16="R 2010_M", OriginFootprint 17="R 2512_M", OriginModelName="R 0603", SymbolName=R, UniqueId=d9f908b8ca857374, 封装库来自淘宝卖家 ID：黄晶宝石=其他店铺购入均为盗版，不享受售后技术支持服务，请立即申请退款, 版权归属="来自淘宝 ID：黄晶宝石", 联系售后=https://shop463601444.taobao.com
  R234: AddInBom=yes, DesignItemID=R, Device=R, FootprintName="R 0603_L", LibraryName="0.1 - 电阻-电容-电感", Origin Footprint="R 0201_L", OriginFootprint 2="R 0402_L", OriginFootprint 3="R 0805_L", OriginFootprint 4="R 1206_L", OriginFootprint 5="R 1210_L", OriginFootprint 6="R 1812_L", OriginFootprint 7="R 2010_L", OriginFootprint 8="R 2512_L", OriginFootprint 9="R 0201_M", OriginFootprint 10="R 0402_M", OriginFootprint 11="R 0603_M", OriginFootprint 12="R 0805_M", OriginFootprint 13="R 1206_M", OriginFootprint 14="R 1210_M", OriginFootprint 15="R 1812_M", OriginFootprint 16="R 2010_M", OriginFootprint 17="R 2512_M", OriginModelName="R 0603", SymbolName=R, UniqueId=2aff7b51dc10ad2a, 封装库来自淘宝卖家 ID：黄晶宝石=其他店铺购入均为盗版，不享受售后技术支持服务，请立即申请退款, 版权归属="来自淘宝 ID：黄晶宝石", 联系售后=https://shop463601444.taobao.com
  R238: AddInBom=yes, DesignItemID=R, Device=R, FootprintName="R 0603_L", LibraryName="0.1 - 电阻-电容-电感", Origin Footprint="R 0201_L", OriginFootprint 2="R 0402_L", OriginFootprint 3="R 0805_L", OriginFootprint 4="R 1206_L", OriginFootprint 5="R 1210_L", OriginFootprint 6="R 1812_L", OriginFootprint 7="R 2010_L", OriginFootprint 8="R 2512_L", OriginFootprint 9="R 0201_M", OriginFootprint 10="R 0402_M", OriginFootprint 11="R 0603_M", OriginFootprint 12="R 0805_M", OriginFootprint 13="R 1206_M", OriginFootprint 14="R 1210_M", OriginFootprint 15="R 1812_M", OriginFootprint 16="R 2010_M", OriginFootprint 17="R 2512_M", OriginModelName="R 0603", SymbolName=R, UniqueId=d3271885c7b6eafc, 封装库来自淘宝卖家 ID：黄晶宝石=其他店铺购入均为盗版，不享受售后技术支持服务，请立即申请退款, 版权归属="来自淘宝 ID：黄晶宝石", 联系售后=https://shop463601444.taobao.com
  R239: AddInBom=yes, DesignItemID=R, Device=R, FootprintName="R 0603_L", LibraryName="0.1 - 电阻-电容-电感", Origin Footprint="R 0201_L", OriginFootprint 2="R 0402_L", OriginFootprint 3="R 0805_L", OriginFootprint 4="R 1206_L", OriginFootprint 5="R 1210_L", OriginFootprint 6="R 1812_L", OriginFootprint 7="R 2010_L", OriginFootprint 8="R 2512_L", OriginFootprint 9="R 0201_M", OriginFootprint 10="R 0402_M", OriginFootprint 11="R 0603_M", OriginFootprint 12="R 0805_M", OriginFootprint 13="R 1206_M", OriginFootprint 14="R 1210_M", OriginFootprint 15="R 1812_M", OriginFootprint 16="R 2010_M", OriginFootprint 17="R 2512_M", OriginModelName="R 0603", SymbolName=R, UniqueId=81023e11c17a14a6, 封装库来自淘宝卖家 ID：黄晶宝石=其他店铺购入均为盗版，不享受售后技术支持服务，请立即申请退款, 版权归属="来自淘宝 ID：黄晶宝石", 联系售后=https://shop463601444.taobao.com
  R240: AddInBom=yes, DesignItemID=R, Device=R, FootprintName="R 0603_L", LibraryName="0.1 - 电阻-电容-电感", Origin Footprint="R 0201_L", OriginFootprint 2="R 0402_L", OriginFootprint 3="R 0805_L", OriginFootprint 4="R 1206_L", OriginFootprint 5="R 1210_L", OriginFootprint 6="R 1812_L", OriginFootprint 7="R 2010_L", OriginFootprint 8="R 2512_L", OriginFootprint 9="R 0201_M", OriginFootprint 10="R 0402_M", OriginFootprint 11="R 0603_M", OriginFootprint 12="R 0805_M", OriginFootprint 13="R 1206_M", OriginFootprint 14="R 1210_M", OriginFootprint 15="R 1812_M", OriginFootprint 16="R 2010_M", OriginFootprint 17="R 2512_M", OriginModelName="R 0603", SymbolName=R, UniqueId=a074999702fa02e6, 封装库来自淘宝卖家 ID：黄晶宝石=其他店铺购入均为盗版，不享受售后技术支持服务，请立即申请退款, 版权归属="来自淘宝 ID：黄晶宝石", 联系售后=https://shop463601444.taobao.com
  R241: AddInBom=yes, DesignItemID=R, Device=R, FootprintName="R 0603_L", LibraryName="0.1 - 电阻-电容-电感", Origin Footprint="R 0201_L", OriginFootprint 2="R 0402_L", OriginFootprint 3="R 0805_L", OriginFootprint 4="R 1206_L", OriginFootprint 5="R 1210_L", OriginFootprint 6="R 1812_L", OriginFootprint 7="R 2010_L", OriginFootprint 8="R 2512_L", OriginFootprint 9="R 0201_M", OriginFootprint 10="R 0402_M", OriginFootprint 11="R 0603_M", OriginFootprint 12="R 0805_M", OriginFootprint 13="R 1206_M", OriginFootprint 14="R 1210_M", OriginFootprint 15="R 1812_M", OriginFootprint 16="R 2010_M", OriginFootprint 17="R 2512_M", OriginModelName="R 0603", SymbolName=R, UniqueId=f8fa280bb9d4afdb, 封装库来自淘宝卖家 ID：黄晶宝石=其他店铺购入均为盗版，不享受售后技术支持服务，请立即申请退款, 版权归属="来自淘宝 ID：黄晶宝石", 联系售后=https://shop463601444.taobao.com
  R242: AddInBom=yes, DesignItemID=R, Device=R, FootprintName="R 0603_L", LibraryName="0.1 - 电阻-电容-电感", Origin Footprint="R 0201_L", OriginFootprint 2="R 0402_L", OriginFootprint 3="R 0805_L", OriginFootprint 4="R 1206_L", OriginFootprint 5="R 1210_L", OriginFootprint 6="R 1812_L", OriginFootprint 7="R 2010_L", OriginFootprint 8="R 2512_L", OriginFootprint 9="R 0201_M", OriginFootprint 10="R 0402_M", OriginFootprint 11="R 0603_M", OriginFootprint 12="R 0805_M", OriginFootprint 13="R 1206_M", OriginFootprint 14="R 1210_M", OriginFootprint 15="R 1812_M", OriginFootprint 16="R 2010_M", OriginFootprint 17="R 2512_M", OriginModelName="R 0603", SymbolName=R, UniqueId=780e728bcbe3c478, 封装库来自淘宝卖家 ID：黄晶宝石=其他店铺购入均为盗版，不享受售后技术支持服务，请立即申请退款, 版权归属="来自淘宝 ID：黄晶宝石", 联系售后=https://shop463601444.taobao.com
  R244: AddInBom=yes, DesignItemID=R, Device=R, FootprintName="R 0603_L", LibraryName="0.1 - 电阻-电容-电感", Origin Footprint="R 0201_L", OriginFootprint 2="R 0402_L", OriginFootprint 3="R 0805_L", OriginFootprint 4="R 1206_L", OriginFootprint 5="R 1210_L", OriginFootprint 6="R 1812_L", OriginFootprint 7="R 2010_L", OriginFootprint 8="R 2512_L", OriginFootprint 9="R 0201_M", OriginFootprint 10="R 0402_M", OriginFootprint 11="R 0603_M", OriginFootprint 12="R 0805_M", OriginFootprint 13="R 1206_M", OriginFootprint 14="R 1210_M", OriginFootprint 15="R 1812_M", OriginFootprint 16="R 2010_M", OriginFootprint 17="R 2512_M", OriginModelName="R 0603", SymbolName=R, UniqueId=a8dad4614b19f40e, 封装库来自淘宝卖家 ID：黄晶宝石=其他店铺购入均为盗版，不享受售后技术支持服务，请立即申请退款, 版权归属="来自淘宝 ID：黄晶宝石", 联系售后=https://shop463601444.taobao.com
  R245: AddInBom=yes, DesignItemID=R, Device=R, FootprintName="R 0603_L", LibraryName="0.1 - 电阻-电容-电感", Origin Footprint="R 0201_L", OriginFootprint 2="R 0402_L", OriginFootprint 3="R 0805_L", OriginFootprint 4="R 1206_L", OriginFootprint 5="R 1210_L", OriginFootprint 6="R 1812_L", OriginFootprint 7="R 2010_L", OriginFootprint 8="R 2512_L", OriginFootprint 9="R 0201_M", OriginFootprint 10="R 0402_M", OriginFootprint 11="R 0603_M", OriginFootprint 12="R 0805_M", OriginFootprint 13="R 1206_M", OriginFootprint 14="R 1210_M", OriginFootprint 15="R 1812_M", OriginFootprint 16="R 2010_M", OriginFootprint 17="R 2512_M", OriginModelName="R 0603", SymbolName=R, UniqueId=61aee2c7162d13e5, 封装库来自淘宝卖家 ID：黄晶宝石=其他店铺购入均为盗版，不享受售后技术支持服务，请立即申请退款, 版权归属="来自淘宝 ID：黄晶宝石", 联系售后=https://shop463601444.taobao.com
  R246: AddInBom=yes, DesignItemID=R, Device=R, FootprintName="R 0603_L", LibraryName="0.1 - 电阻-电容-电感", Origin Footprint="R 0201_L", OriginFootprint 2="R 0402_L", OriginFootprint 3="R 0805_L", OriginFootprint 4="R 1206_L", OriginFootprint 5="R 1210_L", OriginFootprint 6="R 1812_L", OriginFootprint 7="R 2010_L", OriginFootprint 8="R 2512_L", OriginFootprint 9="R 0201_M", OriginFootprint 10="R 0402_M", OriginFootprint 11="R 0603_M", OriginFootprint 12="R 0805_M", OriginFootprint 13="R 1206_M", OriginFootprint 14="R 1210_M", OriginFootprint 15="R 1812_M", OriginFootprint 16="R 2010_M", OriginFootprint 17="R 2512_M", OriginModelName="R 0603", SymbolName=R, UniqueId=09a288aa9d6e3d92, 封装库来自淘宝卖家 ID：黄晶宝石=其他店铺购入均为盗版，不享受售后技术支持服务，请立即申请退款, 版权归属="来自淘宝 ID：黄晶宝石", 联系售后=https://shop463601444.taobao.com
  R247: AddInBom=yes, DesignItemID=R, Device=R, FootprintName="R 0603_L", LibraryName="0.1 - 电阻-电容-电感", Origin Footprint="R 0201_L", OriginFootprint 2="R 0402_L", OriginFootprint 3="R 0805_L", OriginFootprint 4="R 1206_L", OriginFootprint 5="R 1210_L", OriginFootprint 6="R 1812_L", OriginFootprint 7="R 2010_L", OriginFootprint 8="R 2512_L", OriginFootprint 9="R 0201_M", OriginFootprint 10="R 0402_M", OriginFootprint 11="R 0603_M", OriginFootprint 12="R 0805_M", OriginFootprint 13="R 1206_M", OriginFootprint 14="R 1210_M", OriginFootprint 15="R 1812_M", OriginFootprint 16="R 2010_M", OriginFootprint 17="R 2512_M", OriginModelName="R 0603", SymbolName=R, UniqueId=7c41b6516f1c60a6, 封装库来自淘宝卖家 ID：黄晶宝石=其他店铺购入均为盗版，不享受售后技术支持服务，请立即申请退款, 版权归属="来自淘宝 ID：黄晶宝石", 联系售后=https://shop463601444.taobao.com
  R249: AddInBom=yes, DesignItemID=R, Device=R, FootprintName="R 0603_L", LibraryName="0.1 - 电阻-电容-电感", Origin Footprint="R 0201_L", OriginFootprint 2="R 0402_L", OriginFootprint 3="R 0805_L", OriginFootprint 4="R 1206_L", OriginFootprint 5="R 1210_L", OriginFootprint 6="R 1812_L", OriginFootprint 7="R 2010_L", OriginFootprint 8="R 2512_L", OriginFootprint 9="R 0201_M", OriginFootprint 10="R 0402_M", OriginFootprint 11="R 0603_M", OriginFootprint 12="R 0805_M", OriginFootprint 13="R 1206_M", OriginFootprint 14="R 1210_M", OriginFootprint 15="R 1812_M", OriginFootprint 16="R 2010_M", OriginFootprint 17="R 2512_M", OriginModelName="R 0603", SymbolName=R, UniqueId=127bceab6ada68c7, 封装库来自淘宝卖家 ID：黄晶宝石=其他店铺购入均为盗版，不享受售后技术支持服务，请立即申请退款, 版权归属="来自淘宝 ID：黄晶宝石", 联系售后=https://shop463601444.taobao.com
  R250: AddInBom=yes, DesignItemID=R, Device=R, FootprintName="R 0603_L", LibraryName="0.1 - 电阻-电容-电感", Origin Footprint="R 0201_L", OriginFootprint 2="R 0402_L", OriginFootprint 3="R 0805_L", OriginFootprint 4="R 1206_L", OriginFootprint 5="R 1210_L", OriginFootprint 6="R 1812_L", OriginFootprint 7="R 2010_L", OriginFootprint 8="R 2512_L", OriginFootprint 9="R 0201_M", OriginFootprint 10="R 0402_M", OriginFootprint 11="R 0603_M", OriginFootprint 12="R 0805_M", OriginFootprint 13="R 1206_M", OriginFootprint 14="R 1210_M", OriginFootprint 15="R 1812_M", OriginFootprint 16="R 2010_M", OriginFootprint 17="R 2512_M", OriginModelName="R 0603", SymbolName=R, UniqueId=70403c1b3b132533, 封装库来自淘宝卖家 ID：黄晶宝石=其他店铺购入均为盗版，不享受售后技术支持服务，请立即申请退款, 版权归属="来自淘宝 ID：黄晶宝石", 联系售后=https://shop463601444.taobao.com
  R251: AddInBom=yes, DesignItemID=R, Device=R, FootprintName="R 0603_L", LibraryName="0.1 - 电阻-电容-电感", Origin Footprint="R 0201_L", OriginFootprint 2="R 0402_L", OriginFootprint 3="R 0805_L", OriginFootprint 4="R 1206_L", OriginFootprint 5="R 1210_L", OriginFootprint 6="R 1812_L", OriginFootprint 7="R 2010_L", OriginFootprint 8="R 2512_L", OriginFootprint 9="R 0201_M", OriginFootprint 10="R 0402_M", OriginFootprint 11="R 0603_M", OriginFootprint 12="R 0805_M", OriginFootprint 13="R 1206_M", OriginFootprint 14="R 1210_M", OriginFootprint 15="R 1812_M", OriginFootprint 16="R 2010_M", OriginFootprint 17="R 2512_M", OriginModelName="R 0603", SymbolName=R, UniqueId=c7fcac2dc179deab, 封装库来自淘宝卖家 ID：黄晶宝石=其他店铺购入均为盗版，不享受售后技术支持服务，请立即申请退款, 版权归属="来自淘宝 ID：黄晶宝石", 联系售后=https://shop463601444.taobao.com
  R252: AddInBom=yes, DesignItemID=R, Device=R, FootprintName="R 0603_L", LibraryName="0.1 - 电阻-电容-电感", Origin Footprint="R 0201_L", OriginFootprint 2="R 0402_L", OriginFootprint 3="R 0805_L", OriginFootprint 4="R 1206_L", OriginFootprint 5="R 1210_L", OriginFootprint 6="R 1812_L", OriginFootprint 7="R 2010_L", OriginFootprint 8="R 2512_L", OriginFootprint 9="R 0201_M", OriginFootprint 10="R 0402_M", OriginFootprint 11="R 0603_M", OriginFootprint 12="R 0805_M", OriginFootprint 13="R 1206_M", OriginFootprint 14="R 1210_M", OriginFootprint 15="R 1812_M", OriginFootprint 16="R 2010_M", OriginFootprint 17="R 2512_M", OriginModelName="R 0603", SymbolName=R, UniqueId=3f1747bc7cd0165c, 封装库来自淘宝卖家 ID：黄晶宝石=其他店铺购入均为盗版，不享受售后技术支持服务，请立即申请退款, 版权归属="来自淘宝 ID：黄晶宝石", 联系售后=https://shop463601444.taobao.com
  R253: AddInBom=yes, DesignItemID=R, Device=R, FootprintName="R 0603_L", LibraryName="0.1 - 电阻-电容-电感", Origin Footprint="R 0201_L", OriginFootprint 2="R 0402_L", OriginFootprint 3="R 0805_L", OriginFootprint 4="R 1206_L", OriginFootprint 5="R 1210_L", OriginFootprint 6="R 1812_L", OriginFootprint 7="R 2010_L", OriginFootprint 8="R 2512_L", OriginFootprint 9="R 0201_M", OriginFootprint 10="R 0402_M", OriginFootprint 11="R 0603_M", OriginFootprint 12="R 0805_M", OriginFootprint 13="R 1206_M", OriginFootprint 14="R 1210_M", OriginFootprint 15="R 1812_M", OriginFootprint 16="R 2010_M", OriginFootprint 17="R 2512_M", OriginModelName="R 0603", SymbolName=R, UniqueId=086d1dd8ac2c5fca, 封装库来自淘宝卖家 ID：黄晶宝石=其他店铺购入均为盗版，不享受售后技术支持服务，请立即申请退款, 版权归属="来自淘宝 ID：黄晶宝石", 联系售后=https://shop463601444.taobao.com
  R255: AddInBom=yes, DesignItemID=R, Device=R, FootprintName="R 0603_L", LibraryName="0.1 - 电阻-电容-电感", Origin Footprint="R 0201_L", OriginFootprint 2="R 0402_L", OriginFootprint 3="R 0805_L", OriginFootprint 4="R 1206_L", OriginFootprint 5="R 1210_L", OriginFootprint 6="R 1812_L", OriginFootprint 7="R 2010_L", OriginFootprint 8="R 2512_L", OriginFootprint 9="R 0201_M", OriginFootprint 10="R 0402_M", OriginFootprint 11="R 0603_M", OriginFootprint 12="R 0805_M", OriginFootprint 13="R 1206_M", OriginFootprint 14="R 1210_M", OriginFootprint 15="R 1812_M", OriginFootprint 16="R 2010_M", OriginFootprint 17="R 2512_M", OriginModelName="R 0603", SymbolName=R, UniqueId=0b6333695f921556, 封装库来自淘宝卖家 ID：黄晶宝石=其他店铺购入均为盗版，不享受售后技术支持服务，请立即申请退款, 版权归属="来自淘宝 ID：黄晶宝石", 联系售后=https://shop463601444.taobao.com
  R257: AddInBom=yes, DesignItemID=R, Device=R, FootprintName="R 0603_L", LibraryName="0.1 - 电阻-电容-电感", Origin Footprint="R 0201_L", OriginFootprint 2="R 0402_L", OriginFootprint 3="R 0805_L", OriginFootprint 4="R 1206_L", OriginFootprint 5="R 1210_L", OriginFootprint 6="R 1812_L", OriginFootprint 7="R 2010_L", OriginFootprint 8="R 2512_L", OriginFootprint 9="R 0201_M", OriginFootprint 10="R 0402_M", OriginFootprint 11="R 0603_M", OriginFootprint 12="R 0805_M", OriginFootprint 13="R 1206_M", OriginFootprint 14="R 1210_M", OriginFootprint 15="R 1812_M", OriginFootprint 16="R 2010_M", OriginFootprint 17="R 2512_M", OriginModelName="R 0603", SymbolName=R, UniqueId=79cad709e969d650, 封装库来自淘宝卖家 ID：黄晶宝石=其他店铺购入均为盗版，不享受售后技术支持服务，请立即申请退款, 版权归属="来自淘宝 ID：黄晶宝石", 联系售后=https://shop463601444.taobao.com
  R259: AddInBom=yes, DesignItemID=R, Device=R, FootprintName="R 0603_L", LibraryName="0.1 - 电阻-电容-电感", Origin Footprint="R 0201_L", OriginFootprint 2="R 0402_L", OriginFootprint 3="R 0805_L", OriginFootprint 4="R 1206_L", OriginFootprint 5="R 1210_L", OriginFootprint 6="R 1812_L", OriginFootprint 7="R 2010_L", OriginFootprint 8="R 2512_L", OriginFootprint 9="R 0201_M", OriginFootprint 10="R 0402_M", OriginFootprint 11="R 0603_M", OriginFootprint 12="R 0805_M", OriginFootprint 13="R 1206_M", OriginFootprint 14="R 1210_M", OriginFootprint 15="R 1812_M", OriginFootprint 16="R 2010_M", OriginFootprint 17="R 2512_M", OriginModelName="R 0603", SymbolName=R, UniqueId=d1ab67904d4ab3e5, 封装库来自淘宝卖家 ID：黄晶宝石=其他店铺购入均为盗版，不享受售后技术支持服务，请立即申请退款, 版权归属="来自淘宝 ID：黄晶宝石", 联系售后=https://shop463601444.taobao.com
  R260: AddInBom=yes, DesignItemID=R, Device=R, FootprintName="R 0603_L", LibraryName="0.1 - 电阻-电容-电感", Origin Footprint="R 0201_L", OriginFootprint 2="R 0402_L", OriginFootprint 3="R 0805_L", OriginFootprint 4="R 1206_L", OriginFootprint 5="R 1210_L", OriginFootprint 6="R 1812_L", OriginFootprint 7="R 2010_L", OriginFootprint 8="R 2512_L", OriginFootprint 9="R 0201_M", OriginFootprint 10="R 0402_M", OriginFootprint 11="R 0603_M", OriginFootprint 12="R 0805_M", OriginFootprint 13="R 1206_M", OriginFootprint 14="R 1210_M", OriginFootprint 15="R 1812_M", OriginFootprint 16="R 2010_M", OriginFootprint 17="R 2512_M", OriginModelName="R 0603", SymbolName=R, UniqueId=9e71ce6b7342da3b, 封装库来自淘宝卖家 ID：黄晶宝石=其他店铺购入均为盗版，不享受售后技术支持服务，请立即申请退款, 版权归属="来自淘宝 ID：黄晶宝石", 联系售后=https://shop463601444.taobao.com
  R262: AddInBom=yes, DesignItemID=R, Device=R, FootprintName="R 0603_L", LibraryName="0.1 - 电阻-电容-电感", Origin Footprint="R 0201_L", OriginFootprint 2="R 0402_L", OriginFootprint 3="R 0805_L", OriginFootprint 4="R 1206_L", OriginFootprint 5="R 1210_L", OriginFootprint 6="R 1812_L", OriginFootprint 7="R 2010_L", OriginFootprint 8="R 2512_L", OriginFootprint 9="R 0201_M", OriginFootprint 10="R 0402_M", OriginFootprint 11="R 0603_M", OriginFootprint 12="R 0805_M", OriginFootprint 13="R 1206_M", OriginFootprint 14="R 1210_M", OriginFootprint 15="R 1812_M", OriginFootprint 16="R 2010_M", OriginFootprint 17="R 2512_M", OriginModelName="R 0603", SymbolName=R, UniqueId=f7952e9f9cd6773b, 封装库来自淘宝卖家 ID：黄晶宝石=其他店铺购入均为盗版，不享受售后技术支持服务，请立即申请退款, 版权归属="来自淘宝 ID：黄晶宝石", 联系售后=https://shop463601444.taobao.com
  R264: AddInBom=yes, DesignItemID=R, Device=R, FootprintName="R 0603_L", LibraryName="0.1 - 电阻-电容-电感", Origin Footprint="R 0201_L", OriginFootprint 2="R 0402_L", OriginFootprint 3="R 0805_L", OriginFootprint 4="R 1206_L", OriginFootprint 5="R 1210_L", OriginFootprint 6="R 1812_L", OriginFootprint 7="R 2010_L", OriginFootprint 8="R 2512_L", OriginFootprint 9="R 0201_M", OriginFootprint 10="R 0402_M", OriginFootprint 11="R 0603_M", OriginFootprint 12="R 0805_M", OriginFootprint 13="R 1206_M", OriginFootprint 14="R 1210_M", OriginFootprint 15="R 1812_M", OriginFootprint 16="R 2010_M", OriginFootprint 17="R 2512_M", OriginModelName="R 0603", SymbolName=R, UniqueId=ee084f684bde39fa, 封装库来自淘宝卖家 ID：黄晶宝石=其他店铺购入均为盗版，不享受售后技术支持服务，请立即申请退款, 版权归属="来自淘宝 ID：黄晶宝石", 联系售后=https://shop463601444.taobao.com
  R266: AddInBom=yes, DesignItemID=R, Device=R, FootprintName="R 0603_L", LibraryName="0.1 - 电阻-电容-电感", Origin Footprint="R 0201_L", OriginFootprint 2="R 0402_L", OriginFootprint 3="R 0805_L", OriginFootprint 4="R 1206_L", OriginFootprint 5="R 1210_L", OriginFootprint 6="R 1812_L", OriginFootprint 7="R 2010_L", OriginFootprint 8="R 2512_L", OriginFootprint 9="R 0201_M", OriginFootprint 10="R 0402_M", OriginFootprint 11="R 0603_M", OriginFootprint 12="R 0805_M", OriginFootprint 13="R 1206_M", OriginFootprint 14="R 1210_M", OriginFootprint 15="R 1812_M", OriginFootprint 16="R 2010_M", OriginFootprint 17="R 2512_M", OriginModelName="R 0603", SymbolName=R, UniqueId=2eb3813281b987ab, 封装库来自淘宝卖家 ID：黄晶宝石=其他店铺购入均为盗版，不享受售后技术支持服务，请立即申请退款, 版权归属="来自淘宝 ID：黄晶宝石", 联系售后=https://shop463601444.taobao.com
  R268: AddInBom=yes, DesignItemID=R, Device=R, FootprintName="R 0603_L", LibraryName="0.1 - 电阻-电容-电感", Origin Footprint="R 0201_L", OriginFootprint 2="R 0402_L", OriginFootprint 3="R 0805_L", OriginFootprint 4="R 1206_L", OriginFootprint 5="R 1210_L", OriginFootprint 6="R 1812_L", OriginFootprint 7="R 2010_L", OriginFootprint 8="R 2512_L", OriginFootprint 9="R 0201_M", OriginFootprint 10="R 0402_M", OriginFootprint 11="R 0603_M", OriginFootprint 12="R 0805_M", OriginFootprint 13="R 1206_M", OriginFootprint 14="R 1210_M", OriginFootprint 15="R 1812_M", OriginFootprint 16="R 2010_M", OriginFootprint 17="R 2512_M", OriginModelName="R 0603", SymbolName=R, UniqueId=fa394caafc8878d8, 封装库来自淘宝卖家 ID：黄晶宝石=其他店铺购入均为盗版，不享受售后技术支持服务，请立即申请退款, 版权归属="来自淘宝 ID：黄晶宝石", 联系售后=https://shop463601444.taobao.com
R25: BOM_JLCPCB Part Class="Extended Part", BOM_Manufacturer=COV, BOM_Manufacturer Part=14D560K, BOM_Supplier=LCSC, BOM_Supplier Part=C317812, Contributor=LCSC, spicePre=R, spiceSymbolName=14D560K_C317812
R26 R30 R42 R44 R47 R49 R89 R91 R94 R97: library part R_10, "贴片电阻", BOM名称=贴片电阻, 学习资源=www.ooocke.com, 版权归属=源创客
SW1: "1路编码开关", BOM名称=1路编码开关, 学习资源="封装库来自淘宝 ID：黄晶宝石", 技术支持，联系售后=https://shop463601444.taobao.com
SW2: BOM_JLCPCB Part Class="Extended Part", BOM_Manufacturer=Dailywell, BOM_Manufacturer Part=2MS1T2B2VS2QES, BOM_Supplier=LCSC, BOM_Supplier Part=C545202, Contributor=LCSC, spicePre=S, spiceSymbolName=2MS1T2B2VS2QES
SW4: library part "TSW SMD-6x6", BOM名称=贴片6x6轻触开关, 唯一出售店铺网址=https://shop463601444.taobao.com, 版权归属="封装库来自淘宝 ID：黄晶宝石"
U2: library part TPS7A3301RGWR, JLCPCB Part Class="Extended Part", LCSC Part Name="具有使能功能的 1A、高 PSRR、负电压、可调节低压降稳压器", Manufacturer=TI(德州仪器), Operating Temperature=-40℃~+125℃@(Tj), Output Current=1A, Output Voltage=1.175V~33.2V, Power Supply Rejection Ratio (PSRR)=72dB@(10kHz), standby current=210uA, Voltage - Supply=35V, Voltage Dropout=290mV@(500mA), Add into BOM=yes, Convert to PCB=yes, Datasheet=https://www.ti.com/cn/lit/gpn/tps7a33, DesignItemID=TPS7A3301RGWR, Device=TPS7A3301RGWR, Features=欠压锁定；过流保护；带使能；过热保护, FootprintName=PCBComponent_1, LibraryName=TPS7A3301RGWR1_TPS7A3301RGWR, Manufacturer Part=TPS7A3301RGWR, Noise=16uVrms, Number of Outputs=1, Origin Footprint=VQFN-20_L5.0-W5.0-P0.65-TL-EP, OriginFootprint 2=VQFN-20_L5.0-W5.0-P0.65-TL-EP, Output Configuration=负极, Output Type=可调, Supplier=LCSC, Supplier Footprint=VQFN-20-EP(5x5), Supplier Part=C90082, Symbol=TPS7A3301RGWR
U6: "输出类型:固定;工作电压:3.02V~5.5V;输出电压:3V;输出电流:20mA;精度:±0.05%;", JLCPCB Part Class="Extended Part", LCSC Part Name="3.02V~5.5V 串联 460uA 8ppm/℃", Manufacturer=TI(德州仪器), ManufacturerPart=REF2030AIDDCR, Minimum Cathode Current for Regulation=-, Operating Temperature=-40℃~+125℃, Output Current=20mA, Output Voltage=3V, Quiescent Current=460uA, Temperature Coefficient=8ppm/℃, Tolerance=±0.05%, Voltage - Supply=3.02V~5.5V, AddInBom=yes, ConvertToPcb=yes, Datasheet=https://www.ti.com/cn/lit/ds/symlink/ref2030.pdf, Features=使能/关断；内置输出缓冲；多路参考输出, FootprintName=SOT-23-5_L2.9-W1.6-P0.95-LS2.8-BL, ModelId=018c57e721114987ae90467fe9f1d259, ModelName=SOT-23-5_L2.9-W1.6-P0.95-LS2.8-BL, ModelTransform=114.96,110.236,0,0,0,0,0,0,0, Noise - 1/10Hz to 10Hz=12ppmp-p, Noise - 10Hz to 10kHz=-, Output Type=固定, Reference Type=串联, Supplier=LCSC, Supplier Footprint=SOT-23-5, SupplierPart=C528704, Symbol=REF2030AIDDCR
U7: "放大器数:单路;增益带宽积(GBP):10MHz;输入偏置电流(Ib):5pA;输入失调电压(Vos):5uV;压摆率(SR):20V/us;轨到轨:轨到轨输入,轨到轨输出;", Ib - Input Bias Current=5pA, Input Offset Current(Ios)=2pA, Input Offset Voltage Drift(Vos TC)=200nV/℃, JLCPCB Part Class="Extended Part", LCSC Part Name=36V低失调电压、低输入偏置电流、轨到轨输入/输出精密运算放大器，具有e-trim特性, Manufacturer=TI(德州仪器), ManufacturerPart=OPA192IDBVR, Maximum Power Supply Range (Vdd-Vss)=36V, Operating Temperature=-40℃~+125℃, Output Current=65mA, Quiescent Current(Iq)=1mA, Vos - Input Offset Voltage=5uV, AddInBom=yes, Common Mode Rejection Ratio(CMRR)=140dB, ConvertToPcb=yes, Datasheet=https://www.ti.com/cn/lit/gpn/opa192, Dual Supply=-18V~-2.25V；2.25V~18V, FootprintName=SOT-23-5_L3.0-W1.7-P0.95-LS2.8-BL, Gain Bandwidth Product=10MHz, ModelId=0a2a1b8f50944f73965918ad6e5fe167, ModelName=SOT-23-5_L2.9-W1.6-H1.1-LS2.8-P0.95, ModelTransform=118.60433,114.173,0,90,0,0,0.0005,0.0005,0, Noise density(eN)=5.5nV/√Hz@1kHz, Number of Channels=单路, Rail to Rail=轨到轨输入,轨到轨输出, Single Supply=4.5V~36V, Slew Rate=20V/us, Supplier=LCSC, Supplier Footprint=SOT-23-5, SupplierPart=C139648, Symbol=OPA192IDBVR
U8: library part ura2412s-6wr3_c2757452, "特性：超宽4:1输入电压范围。 高效率达85%。 空载功耗低至0.24W。 I/O隔离测试电压1.5kV DC。 输入欠压保护，输出短路、过流保护。 工作环境温度范围：-40℃至+85℃。应用：医疗保健。 工业控制", Capacitive Load(Max)=120uF, Isolation Voltage(Vrms)=1.5kV, JLCPCB Part Class="Extended Part", LCSC Part Name="9V~36V ±12V 250mA 6W", Manufacturer=MORNSUN(金升阳), Operating Temperature=-40℃~+85℃, Output Current(Max)=250mA, Output Power=6W, Output Voltage=±12V, Quiescent Supply Current=-, Voltage - Supply=9V~36V, AddInBom=yes, Conversion Efficiency=83%, ConvertToPcb=yes, Datasheet=https://item.szlcsc.com/datasheet/URA2412S-6WR3/2873721.html, Features=欠压保护；短路保护；过流保护；轻载高效模式, FootprintName=PWRM-TH_URAXXXXS-6WR3, Height=12mm, Length=22mm, ManufacturerPart=URA2412S-6WR3, ModelId=59ee18447e164eb5803ce5c0826121e9, ModelName=PWRM-TH_URAXXXXS-6WR3, ModelTransform=866.14,374.015,0,0,0,0,0,-81.299,-161.417, Number of Outputs=2, Ripple Noise=120mVp-p, Supplier=LCSC, Supplier Footprint=SIP,22x9.5mm, SupplierPart=C2757452, Symbol=URA2412S-6WR3_C2757452, Type=-, Voltage Regulation=-, Width=9.5mm